# Altium PCB PCB01.PcbDoc
Units mm, origin at the board's own origin, x right, y up, seen from the top; angles counter-clockwise.
Board outline 20 x 26 mm, 2 copper layers (Top Layer, Bottom Layer), stack 1.57 mm thick; 2 components, 4 nets, 12 pads, 0 vias.
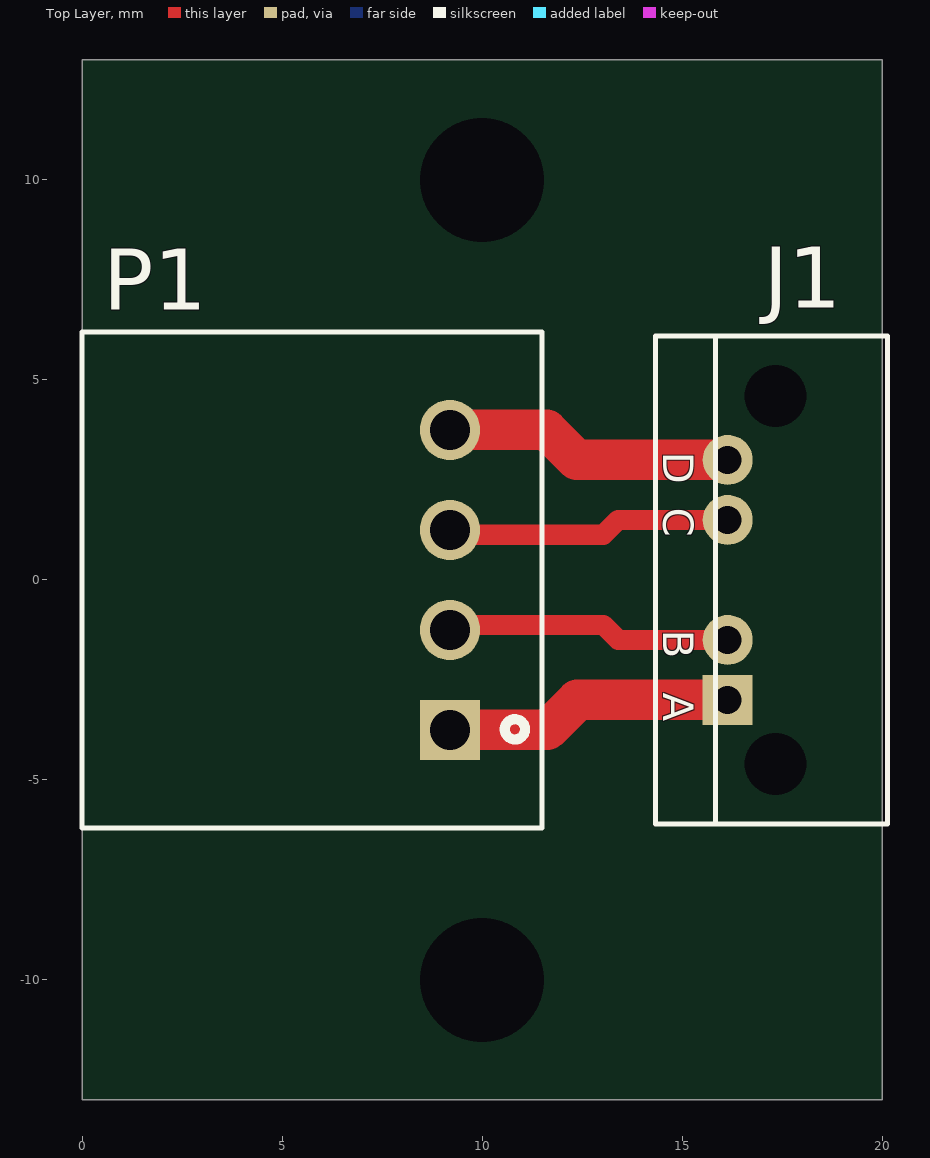
[diagram p0: Top Layer view]
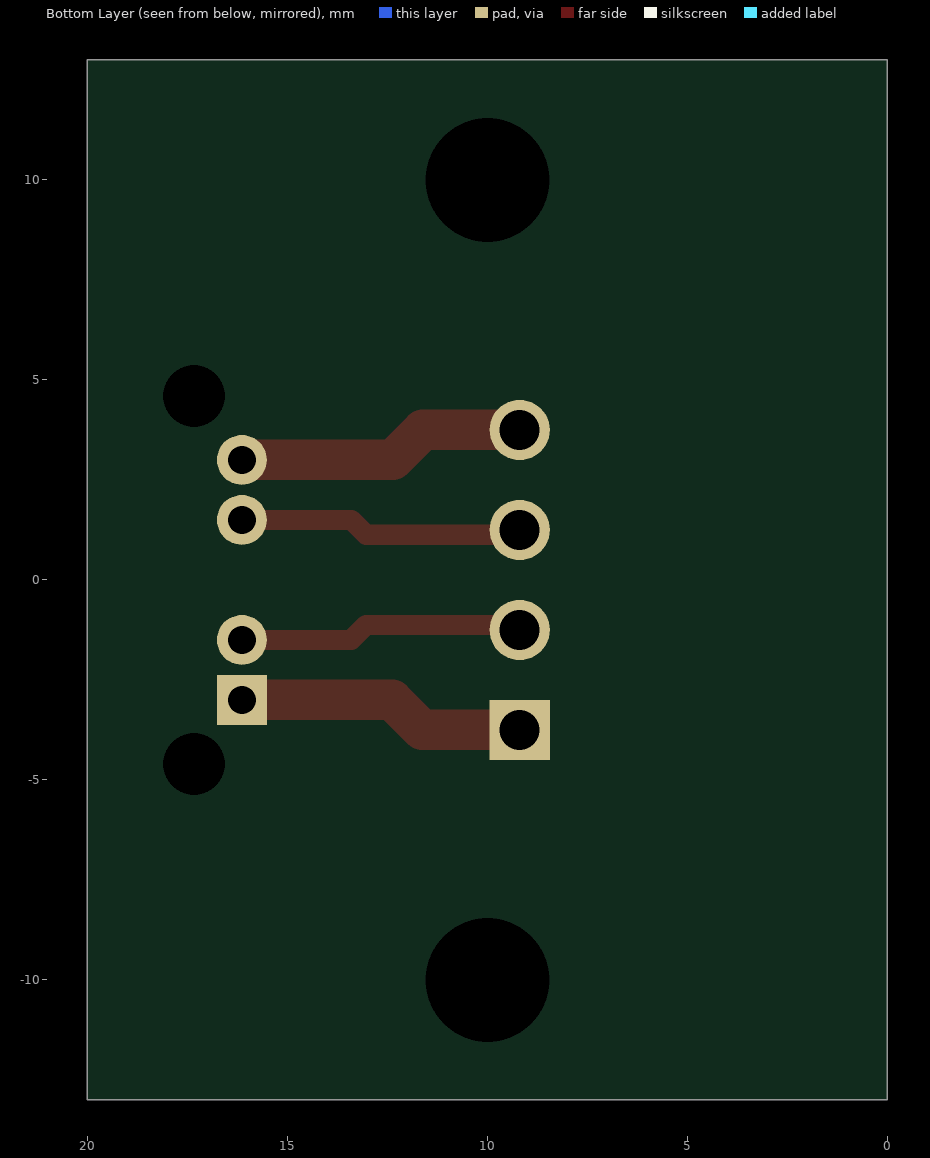
[diagram p1: Bottom Layer view, seen from below]

## Layer stack, top to bottom
Top Solder: solder mask 0.01, Solder Resist, Dk 3.5
Top Layer: signal copper 0.035
Dielectric 1: core 1.5, FR-4, Dk 4.8
Bottom Layer: signal copper 0.035
Bottom Solder: solder mask 0.01, Solder Resist, Dk 3.5

## Board outline
0,-13 0,13 20,13 20,-13

## Design rules (kind name [scope] priority, off if disabled: settings)
Clearance [All] p1: gap=0.254 ignorepadtopadclearanceinfootprint=FALSE except(0.203: THPad-THPad)
HoleSize [All] p1: absolutevalues=TRUE maxlimit=3.1 minlimit=0.025 maxpercent=80.000 minpercent=20.000
MinimumSolderMaskSliver [All] p1: minsoldermaskwidth=0
PolygonConnect [All] p1: connectstyle=Relief reliefconductorwidth=0.254 reliefentries=4 polygonreliefangle="90 Angle" airgapwidth=0.254
RoutingVias [All] p1: holewidth=0.3 width=0.6 viastyle="Through Hole" minholewidth=0.3 minwidth=0.6 maxholewidth=0.3 maxwidth=0.6
SilkToSilkClearance [All] p1: silktosilkclearance=0
SilkToSolderMaskClearance [IsPad] p1: minsilkscreentomaskgap=0 clearancetoexposedcopper=TRUE
SolderMaskExpansion [All] p1: expansion=0.102 istentingtop=FALSE
UnRoutedNet [All] p1: checkbadconnections=TRUE
Width [All] p1: maxlimit=1.016 minlimit=0.254 preferedwidth=0.254 minimp=50.000000 maximp=50.000000 favimp=50.000000
25 further rules are at their usual default settings.

## Components (designator, comment, footprint, x,y, rotation, side; value= is the part's Value field where it differs from the comment)
J1 "HY41226288AM0618W" HY41226288AM0618W 16.739,0 r270 top
P1 "S4B-XH-A(LF)(SN)" JST_S4B-XH-A(LF)(SN) 9.195,0 r90 top

## Footprints (in the part's own frame and the unit in brackets; to place one, negate y for a bottom-side part, rotate by r counter-clockwise, add the part's x,y. Pads: shape width x height; smd on the part's side, far side on the other; paste and mask are expansions set on the pad)
HY41226288AM0618W [mm]
  rect 1.25x1.25 hole 0.7: 1(3,-0.6)
  round 1.25 hole 0.7: 2(1.5,-0.6) 3(-1.5,-0.6) 4(-3,-0.6)
  round 0 hole 1.55 unplated: MH(4.6,0.6) MH1(-4.6,0.6)
  silkscreen extent -6.1,-2.4 6.1,3.4, body extent -6.1,-2.1 6.1,7.9, height 4.9
JST_S4B-XH-A(LF)(SN) [mm]
  rect 1.508x1.508 / inner round 1.508 / far side rect 1.508x1.508 hole 1: 1(-3.75,0)
  round 1.508 hole 1: 2(-1.25,0) 3(1.25,0) 4(3.75,0)
  silkscreen extent -6.2,-2.3 6.2,9.2, body extent -6.17,-2.32 6.23,9.18, height 6.15

## Part data
J1: "POGO RECPT 5-48V/3A"
P1: "Conn Shrouded Header (4 Sides) HDR 4 POS 2.5mm Solder RA Side Entry Thru-Hole Box", Package=None, Availability="In Stock", Check_prices=https://www.snapeda.com/parts/S4B-XH-A(LF)(SN)/ACT/view-part/?ref=eda, MF="J.S.T. Manufacturing Co", MP=S4B-XH-A(LF)(SN), Price=None, SnapEDA_Link=https://www.snapeda.com/parts/S4B-XH-A(LF)(SN)/ACT/view-part/?ref=snap

## Free pads (board coordinates)
  round 0 hole 3.1 unplated: MH2(10,10) MH3(10,-10)

## Nets (pads, with @x,y where several pads share a name; then routed paths per layer and width w, separated by ;. In a path a pad name is that pad's centre, name@x,y a point inside that pad or via, vN(x,y) a via of type N, cw(c..) or ccw(c..) an arc to the next point about the centre after c; other vN are vias at no path point)
NetJ1_1: J1.1 P1.1 | length 7.3
  Top Layer w1.016: P1.1@9.22,-3.75 11.631,-3.75 12.381,-3 J1.1@16.164,-3
NetJ1_2: J1.2 P1.2 | length 7.2
  Top Layer w0.508: P1.2@9.22,-1.25 9.345,-1.125 13.03,-1.125 13.405,-1.5 J1.2@16.164,-1.5
NetJ1_3: J1.3 P1.3 | length 7.2
  Top Layer w0.508: P1.3@9.22,1.25 9.345,1.125 13.03,1.125 13.405,1.5 J1.3@16.164,1.5
NetJ1_4: J1.4 P1.4 | length 7.3
  Top Layer w1.016: P1.4@9.22,3.75 11.617,3.75 12.367,3 J1.4@16.164,3
pads on no net: J1.MH J1.MH1

## Silkscreen, mask and mechanical layers (free items; w line width, h text height)
Board Outline:
  the board outline again, w0.254
Fabrication:
  drawing of 191 lines, arcs and shapes, not listed
  text "Layer" at 36.426,10.693 h1.52
  text "Name" at 46.838,10.693 h1.52
  text "Material" at 70.453,10.693 h1.52
  text "Thickness" at 92.291,10.693 h1.52
  text "Constant" at 108.797,10.693 h1.52
  text "Board Layer Stack" at 123.271,10.693 h1.52
  text "Top Overlay" at 46.838,7.645 h1.52
  text "Top Solder" at 46.838,4.597 h1.52
  text "Solder Resist" at 70.453,4.597 h1.52
  text "0.010mm" at 92.291,4.597 h1.52
  text "3.5" at 108.797,4.597 h1.52
  text "1" at 36.426,1.549 h1.52
  text "Top Layer" at 46.838,1.549 h1.52
  text "0.035mm" at 92.291,1.549 h1.52
  text "Dielectric 1" at 46.838,-1.499 h1.52
  text "FR-4" at 70.453,-1.499 h1.52
  text "1.500mm" at 92.291,-1.499 h1.52
  text "4.8" at 108.797,-1.499 h1.52
  text "2" at 36.426,-4.547 h1.52
  text "Bottom Layer" at 46.838,-4.547 h1.52
  text "0.035mm" at 92.291,-4.547 h1.52
  text "Bottom Solder" at 46.838,-7.595 h1.52
  text "Solder Resist" at 70.453,-7.595 h1.52
  text "0.010mm" at 92.291,-7.595 h1.52
  text "3.5" at 108.797,-7.595 h1.52
  text "Bottom Overlay" at 46.838,-10.643 h1.52
  text "Total board thickness:" at 36.426,-13.691 h1.52
  text "1.590mm" at 92.291,-13.691 h1.52
Drill Drawing:
  circle w0.254: c2.067,27.44 r0.847
  lines w0.254: 1.221,30.404 2.914,30.404 2.914,32.097 1.221,32.097 1.221,30.404 ; 1.221,34.637 1.644,34.637 2.067,34.214 2.491,34.637 2.914,34.637 2.491,35.06 2.914,35.484 2.491,35.484 2.067,35.907 1.644,35.484 1.221,35.484 1.644,35.06 1.221,34.637 ; 1.221,39.717 2.914,39.717 2.067,38.024 1.221,39.717
  lines w0.381: -0.298,25.451 177.251,25.451 ; -0.298,40.691 177.251,40.691 ; 13.694,21.641 13.694,44.501 ; 27.153,21.641 27.153,44.501 ; 56.1,21.641 56.1,44.501 ; 68.949,21.641 68.949,44.501 ; 87.588,21.641 87.588,44.501 ; 125.677,21.641 125.677,44.501 ; 140.659,21.641 140.659,44.501 ; 159.602,21.641 159.602,44.501 ; -0.298,21.641 177.251,21.641 177.251,44.501 -0.298,44.501 -0.298,21.641
  text "Symbol" at 1.988,41.834 h1.83
  text "Count" at 14.837,41.834 h1.83
  text "Hole Size" at 28.296,41.834 h1.83
  text "Plated" at 57.243,41.834 h1.83
  text "Hole Type" at 70.092,41.834 h1.83
  text "Drill Layer Pair" at 88.731,41.834 h1.83
  text "Via/Pad" at 126.82,41.834 h1.83
  text "Pad Shape" at 141.802,41.834 h1.83
  text "Template" at 160.745,41.834 h1.83
  text "2" at 14.837,38.024 h1.52
  text "61.02mil (1.550mm)" at 28.296,38.024 h1.52
  text "NPTH" at 57.243,38.024 h1.52
  text "Round" at 70.092,38.024 h1.52
  text "Top Layer - Bottom Layer" at 88.731,38.024 h1.52
  text "Pad" at 126.82,38.024 h1.52
  text "Rounded" at 141.802,38.024 h1.52
  text "c0hn155" at 160.745,38.024 h1.52
  text "2" at 14.837,34.214 h1.52
  text "122.05mil (3.100mm)" at 28.296,34.214 h1.52
  text "NPTH" at 57.243,34.214 h1.52
  text "Round" at 70.092,34.214 h1.52
  text "Top Layer - Bottom Layer" at 88.731,34.214 h1.52
  text "Pad" at 126.82,34.214 h1.52
  text "Rounded" at 141.802,34.214 h1.52
  text "c0hn310" at 160.745,34.214 h1.52
  text "4" at 14.837,30.404 h1.52
  text "27.56mil (0.700mm)" at 28.296,30.404 h1.52
  text "PTH" at 57.243,30.404 h1.52
  text "Round" at 70.092,30.404 h1.52
  text "Top Layer - Bottom Layer" at 88.731,30.404 h1.52
  text "Pad" at 126.82,30.404 h1.52
  text "(Mixed)" at 141.802,30.404 h1.52
  text "(Mixed)" at 160.745,30.404 h1.52
  text "4" at 14.837,26.594 h1.52
  text "39.37mil (1.000mm)" at 28.296,26.594 h1.52
  text "PTH" at 57.243,26.594 h1.52
  text "Round" at 70.092,26.594 h1.52
  text "Top Layer - Bottom Layer" at 88.731,26.594 h1.52
  text "Pad" at 126.82,26.594 h1.52
  text "Rounded" at 141.802,26.594 h1.52
  text "(Mixed)" at 160.745,26.594 h1.52
  text "12 Total" at 14.837,22.784 h1.52

## Dimensions
20,13 to 20,-13 on Dimensions
0,13 to 20,13 on Dimensions

## Text inside footprints (layer, text, board x,y; h text height)
J1: Top Overlay "A" at 14.529,-2.819 h0.76 r270; Top Overlay "B" at 14.529,-1.245 h0.76 r270; Top Overlay "C" at 14.529,1.803 h0.76 r270; Top Overlay "D" at 14.529,3.2 h0.76 r270